# Altium PCB turn-signal-indicator.PcbDoc
Units mm, origin at the board's own origin, x right, y up, seen from the top; angles counter-clockwise.
Board outline 60 x 35 mm, 2 copper layers (Top Layer, Bottom Layer); 18 components, 11 nets, 40 pads, 0 vias.
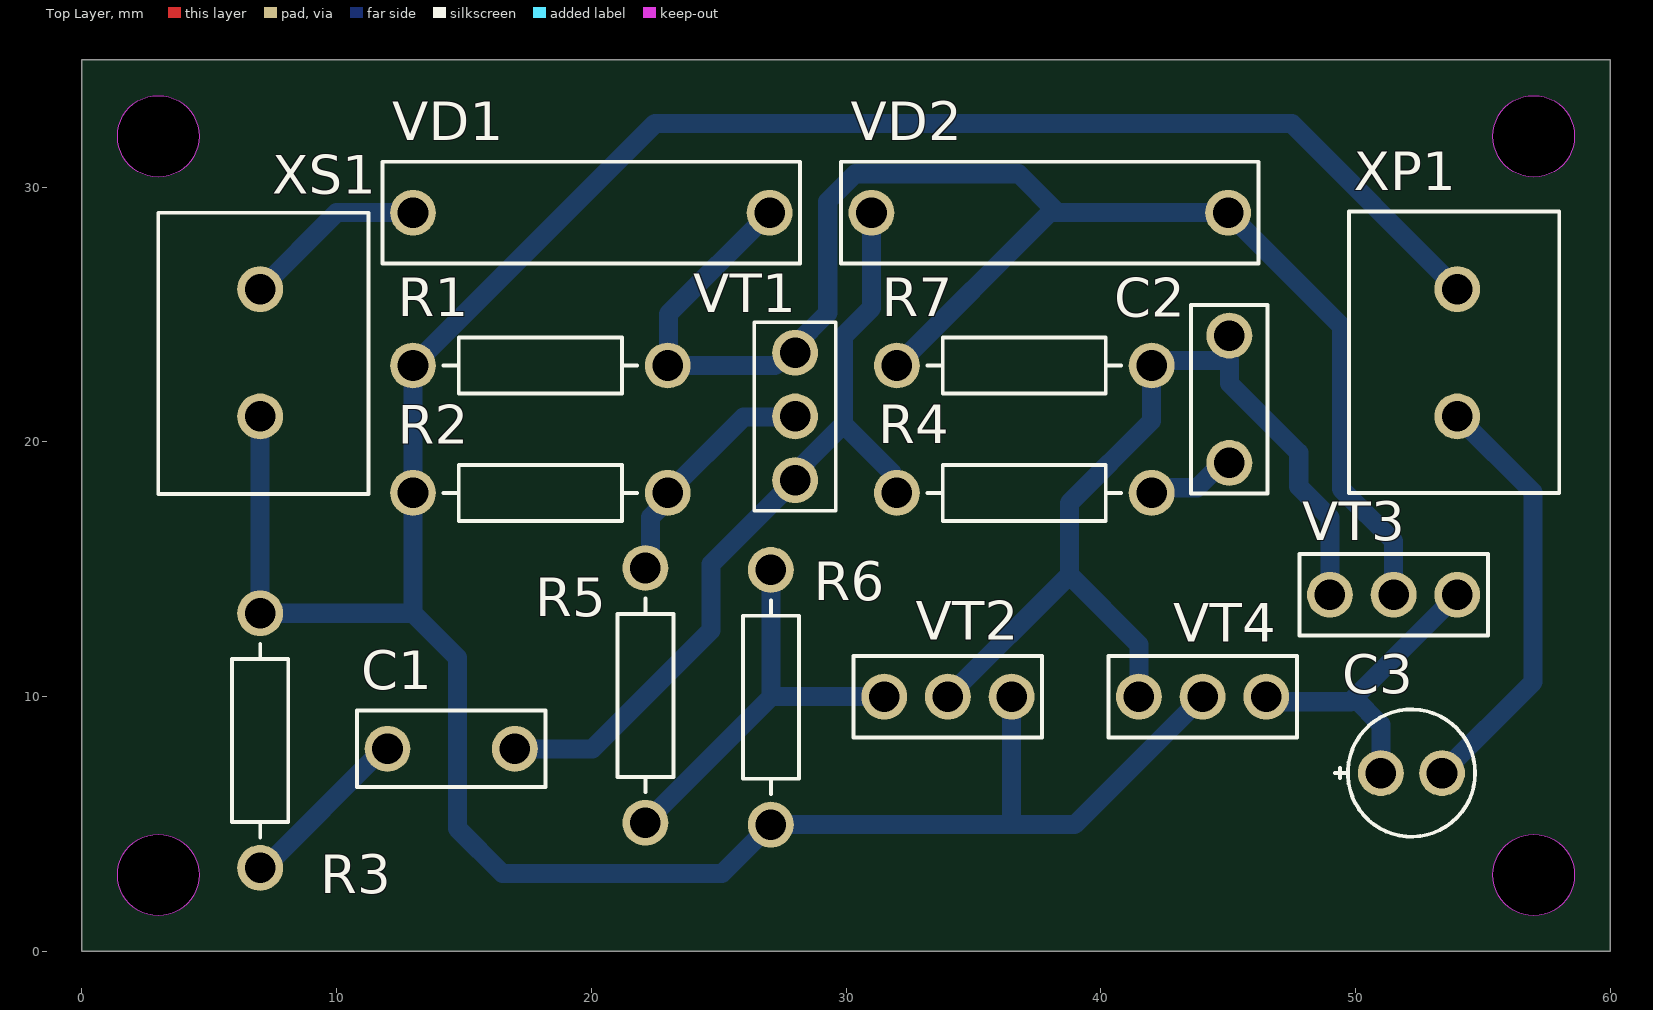
[diagram p0: Top Layer view]
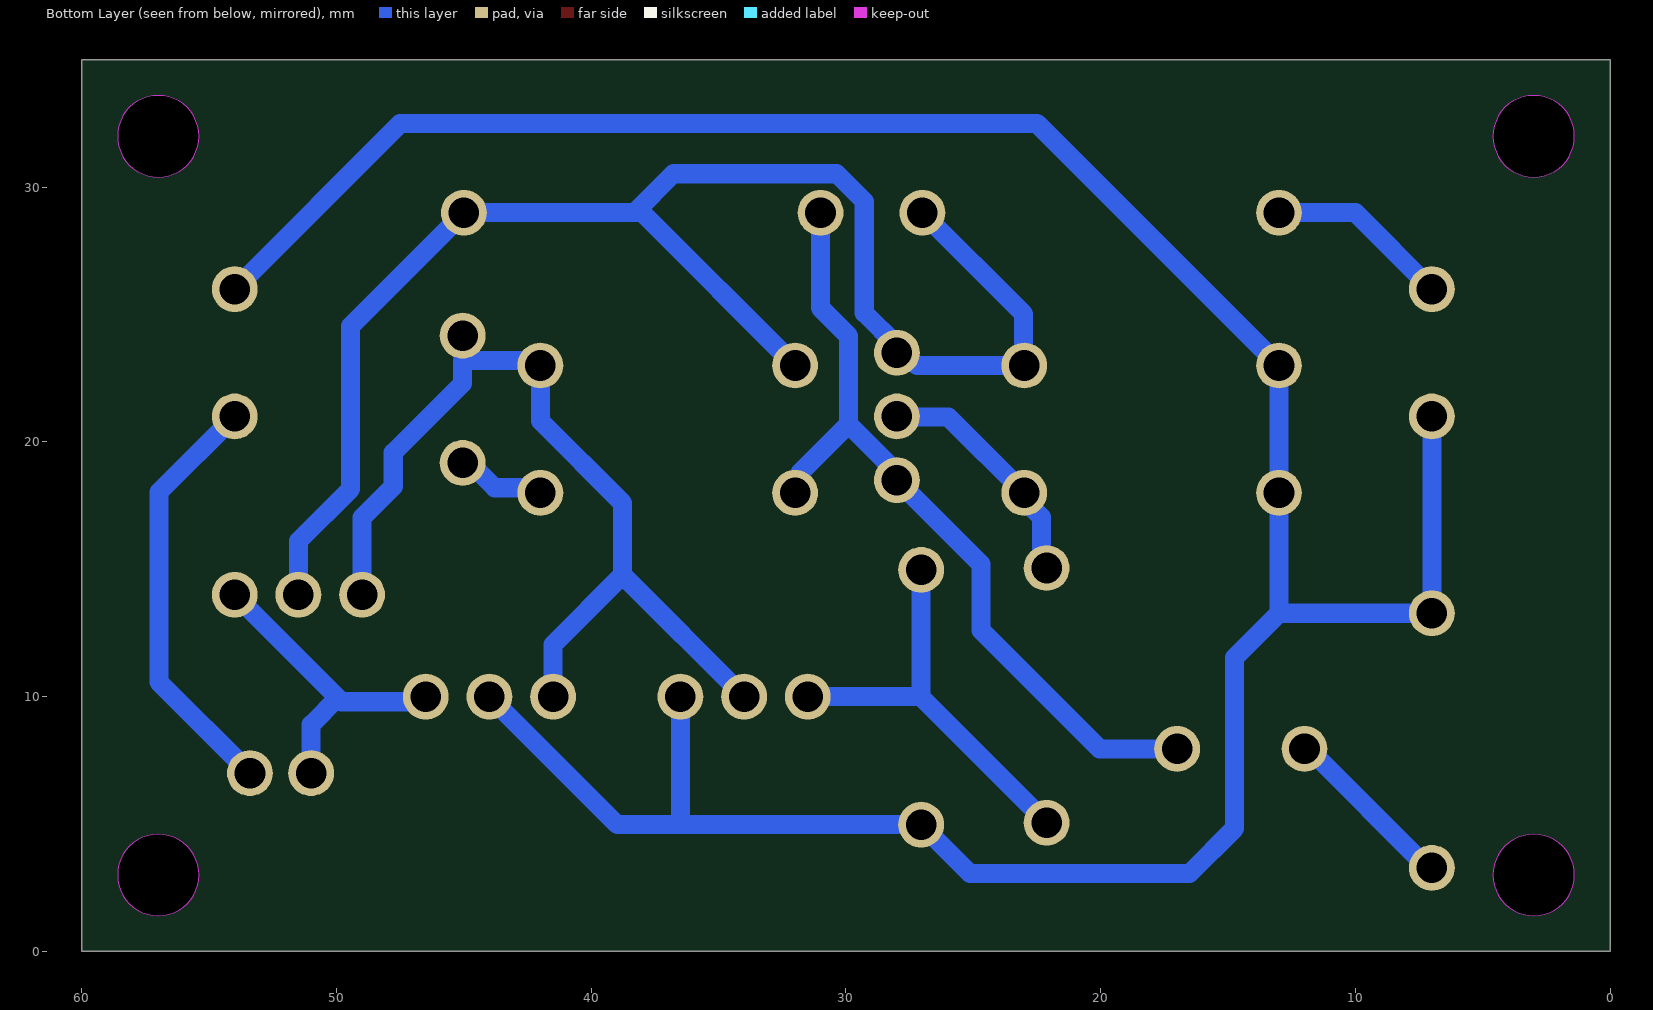
[diagram p1: Bottom Layer view, seen from below]
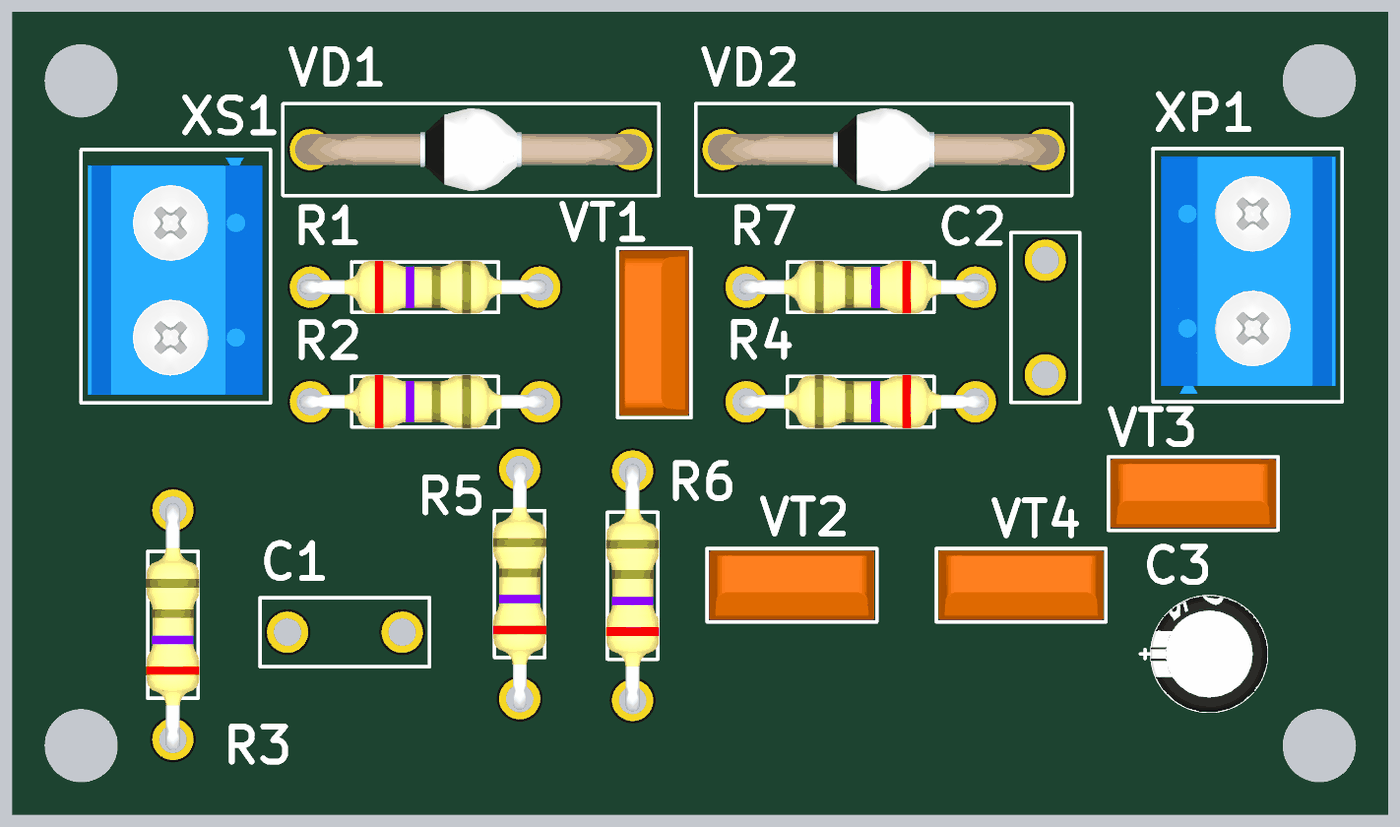
[diagram p2: 3D render of the assembled board from above, using the file's embedded part models]

## Layer stack, top to bottom
Top Solder: solder mask 0.0102, Solder Resist, Dk 3.5
Top Layer: signal copper 0.0356
Dielectric 1: dielectric 0.32, FR-4, Dk 4.8
Bottom Layer: signal copper 0.0356
Bottom Solder: solder mask 0.0102, Solder Resist, Dk 3.5

## Board outline
0,0 60,0 60,35 0,35
cut-out: 57,30.4 cw(c57,32) 55.4,32 cw(c57,32) 57,33.6 cw(c57,32) 58.6,32 cw(c57,32)
cut-out: 57,1.4 cw(c57,3) 55.4,3 cw(c57,3) 57,4.6 cw(c57,3) 58.6,3 cw(c57,3)
cut-out: 3,1.4 cw(c3,3) 1.4,3 cw(c3,3) 3,4.6 cw(c3,3) 4.6,3 cw(c3,3)
cut-out: 3,30.4 cw(c3,32) 1.4,32 cw(c3,32) 3,33.6 cw(c3,32) 4.6,32 cw(c3,32)

## Design rules (kind name [scope] priority, off if disabled: settings)
Clearance [All] p1: gap=0.254 ignorepadtopadclearanceinfootprint=FALSE except(0: Arc-Hole Track-Hole SMDPad-Hole THPad-Hole Via-Hole Fill-Hole Poly-Hole Region-Hole Text-Hole)
PolygonConnect [All] p1: connectstyle=Relief reliefconductorwidth=0.254 reliefentries=4 polygonreliefangle="90 Angle" airgapwidth=0.254
RoutingVias [All] p1: holewidth=0.711 width=1.27 viastyle="Through Hole" minholewidth=0.711 minwidth=1.27 maxholewidth=0.711 maxwidth=1.27
SolderMaskExpansion [All] p1: expansion=0.102 istentingtop=FALSE
Width [All] p1: maxlimit=1 minlimit=0.25 preferedwidth=0.75 minimp=50.000000 maximp=50.000000 favimp=50.000000
30 further rules are at their usual default settings.

## Components (designator, comment, footprint, x,y, rotation, side; value= is the part's Value field where it differs from the comment)
C1 "0,15uF" C_KM5B_1000 14.5,7.95 r0 top
C2 "1000 pF" C_KM5B_1000 45.05,21.675 r270 top
C3 "3.3uF" C_KM50-35 52.2,7 r0 top
R1 "15k" R_CF-25_C1-4 18,23 r0 top
R2 "2.7k" R_CF-25_C1-4 18,18 r0 top
R3 "470k" R_CF-25_C1-4 7,8.275 r90 top
R4 "22k" R_CF-25_C1-4 37,18 r180 top
R5 "8.2k" R_CF-25_C1-4 22.125,10.05 r90 top
R6 "2.7k" R_CF-25_C1-4 27.05,9.975 r90 top
R7 "3k" R_CF-25_C1-4 37,23 r180 top
VD1 "КД102А" VD_KD30 20,29 r0 top
VD2 "КД103А" VD_KD30 38,29 r0 top
VT1 "КТ361Б" VT_KT-13 28,18.5 r90 top
VT2 "КТ315Б" VT_KT-13 31.5,10 r0 top
VT3 "КТ315Б" VT_KT-13 49,14 r0 top
VT4 "КТ361Б" VT_KT-13 41.5,10 r0 top
XP1 "*" X_2Pin_5.0mm 54,23.5 r90 top
XS1 "*" X_2Pin_5.0mm 7,23.5 r270 top

## Footprints (in the part's own frame and the unit in brackets; to place one, negate y for a bottom-side part, rotate by r counter-clockwise, add the part's x,y. Pads: shape width x height; smd on the part's side, far side on the other; paste and mask are expansions set on the pad)
C_KM5B_1000 [mm] "PCB footprint for KM5B capacitor"
  round 1.8 hole 1.2: 1(-2.5,0) 2(2.5,0)
  silkscreen extent -3.7,-1.5 3.7,1.5, body extent -2.79,-1.25 2.79,1.25, height 7.5
C_KM50-35 [mm] "PCB footprint for KM50-35 capacitor"
  round 1.8 hole 1.2: 1(-1.2,0) 2(1.2,0)
  silkscreen extent -3,-2.5 2.5,2.5, body extent -2.55,-2.55 2.55,2.55, height 13.05
R_CF-25_C1-4 [mm] "PCB footprint for CF-25 / C1-4 resistor"
  round 1.8 hole 1.2: 1(-5,0) 2(5,0)
  silkscreen extent -3.8,-1.1 3.8,1.1, body extent -5.47,-1.16 5.3,1.16, height 2.93
VD_KD30 [mm] "Diode footprint, KD-30 package"
  round 1.8 hole 1.2: 1(-7,0) 2(7,0)
  silkscreen extent -8.2,-2 8.2,2, body extent -7.68,-1.82 7.68,1.82, height 5.82
VT_KT-13 [mm]
  round 1.8 hole 1.2: 1(0,0) 2(2.5,0) 3(5,0)
  silkscreen extent -1.2,-1.6 6.2,1.6, body extent -1.1,-1.5 6.1,1.5, height 9
X_2Pin_5.0mm [mm] "2-pin connector footprint"
  round 1.8 hole 1.2: 1(-2.5,0) 2(2.5,0)
  silkscreen extent -5.5,-4 5.55,4.25, body extent -5.15,-3.7 5.2,3.9, height 10.46

## Part data
C1 C2: library part C_NonPolarized, "Non-polarized capacitor"
C3: library part C_Polarized, "Polarized capacitor"
R1 R2 R3 R4 R5 R6 R7: library part R_Resistor, "Resistor"
VD1 VD2: library part VD_Diode, "Diode"
VT1 VT4: library part VT_BJT_PNP, "PNP bipolar junction transistor"
VT2 VT3: library part VT_BJT_NPN, "NPN bipolar junction transistor"
XP1: library part XP_Connector_2Pin, "2-pin connector (plug)"
XS1: library part XS_Connector_2Pin, "2-pin connector (socket)"

## Nets (pads, with @x,y where several pads share a name; then routed paths per layer and width w, separated by ;. In a path a pad name is that pad's centre, name@x,y a point inside that pad or via, vN(x,y) a via of type N, cw(c..) or ccw(c..) an arc to the next point about the centre after c; other vN are vias at no path point)
GND: R1.1 R2.1 R3.2 R6.1 VT2.3 VT4.2 XP1.2 XS1.2 | length 118.2
  Bottom Layer w0.75: XS1.2 R3.2 13,13.275 ; VT2.3 36.5,5 36.475,4.975 ; VT4.2 38.975,4.975 36.475,4.975 ; XP1.2 47.5,32.5 22.5,32.5 R1.1 R2.1 13,13.275 ; 13,13.275 14.75,11.525 14.75,4.825 16.525,3.05 23.425,3.05 25.125,3.05 R6.1 36.475,4.975
NetC1_1: C1.1 R3.1 | length 6.9
  Bottom Layer w0.75: R3.1 7.163,3.275 11.837,7.95 C1.1
NetC1_2: C1.2 R4.2 VD2.1 VT1.1 | length 32.2
  Bottom Layer w0.75: C1.2 20.05,7.95 24.7,12.6 24.7,15.2 VT1.1 28,18.784 28.525,19.309 28.525,19.325 29.9,20.7 ; VD2.1 31,25.258 29.9,24.158 29.9,20.7 ; R4.2 31.799,18.201 31.799,18.801 29.9,20.7
NetC2_1: C2.1 R7.1 VT2.2 VT3.1 VT4.1 | length 36.8
  Bottom Layer w0.75: VT2.2 38.775,14.775 ; VT4.1 41.5,12.05 38.775,14.775 ; C2.1@45.05,23.525 C2.1 ; VT3.1 49,17.025 47.775,18.25 47.775,19.575 45.05,22.3 45.05,23.201 42.201,23.201 R7.1 42,20.825 38.775,17.6 38.775,14.775
NetC2_2: C2.2 R4.1 | length 3.5
  Bottom Layer w0.75: R4.1 42.201,18.201 43.792,18.201 44.766,19.175 C2.2
NetC3_1: C3.1 VT3.3 VT4.3 | length 12.7
  Bottom Layer w0.75: VT4.3 46.701,9.799 49.799,9.799 VT3.3 ; 49.95,9.95 51,8.9 C3.1
NetC3_2: C3.2 XP1.1 | length 16.7
  Bottom Layer w0.75: C3.2 56.975,10.575 56.975,18.025 XP1.1
NetR1_2: R1.2 R7.2 VD1.2 VD2.2 VT1.3 VT3.2 | length 62.6
  Bottom Layer w0.75: VD1.2 23.025,25.025 23.025,23.025 R1.2 27.216,23 27.716,23.5 VT1.3 28,23.784 29.284,25.068 29.284,29.446 30.367,30.529 36.777,30.529 38.306,29 ; R7.2 38,29 38.306,29 ; VT3.2 51.5,16.1 49.45,18.15 49.45,24.55 VD2.2 38.306,29
NetR2_2: R2.2 R5.2 VT1.2 | length 9.6
  Bottom Layer w0.75: R5.2 22.326,15.251 22.326,17.042 23,17.716 R2.2 25.975,20.975 27.975,20.975 VT1.2
NetR5_1: R5.1 R6.2 VT2.1 | length 16.4
  Bottom Layer w0.75: R5.1 27.05,9.975 ; R6.2 27.05,9.975 ; VT2.1 27.075,10 27.05,9.975
NetVD1_1: VD1.1 XS1.1 | length 7.2
  Bottom Layer w0.75: XS1.1 10,29 VD1.1

## Silkscreen, mask and mechanical layers (free items; w line width, h text height)
Mechanical 1:
  circle w0.254: c57,32 r1.6